# Altium PCB 24V-7A-Power-Board-v2.0.PcbDoc (part 5 of 5)
Units mil, origin at the board's own origin, x right, y up, seen from the top; angles counter-clockwise.
Board outline 4921.26 x 6102.36 mil, 2 copper layers (Top Layer, Bottom Layer); 158 components, 79 nets, 394 pads, 81 vias.
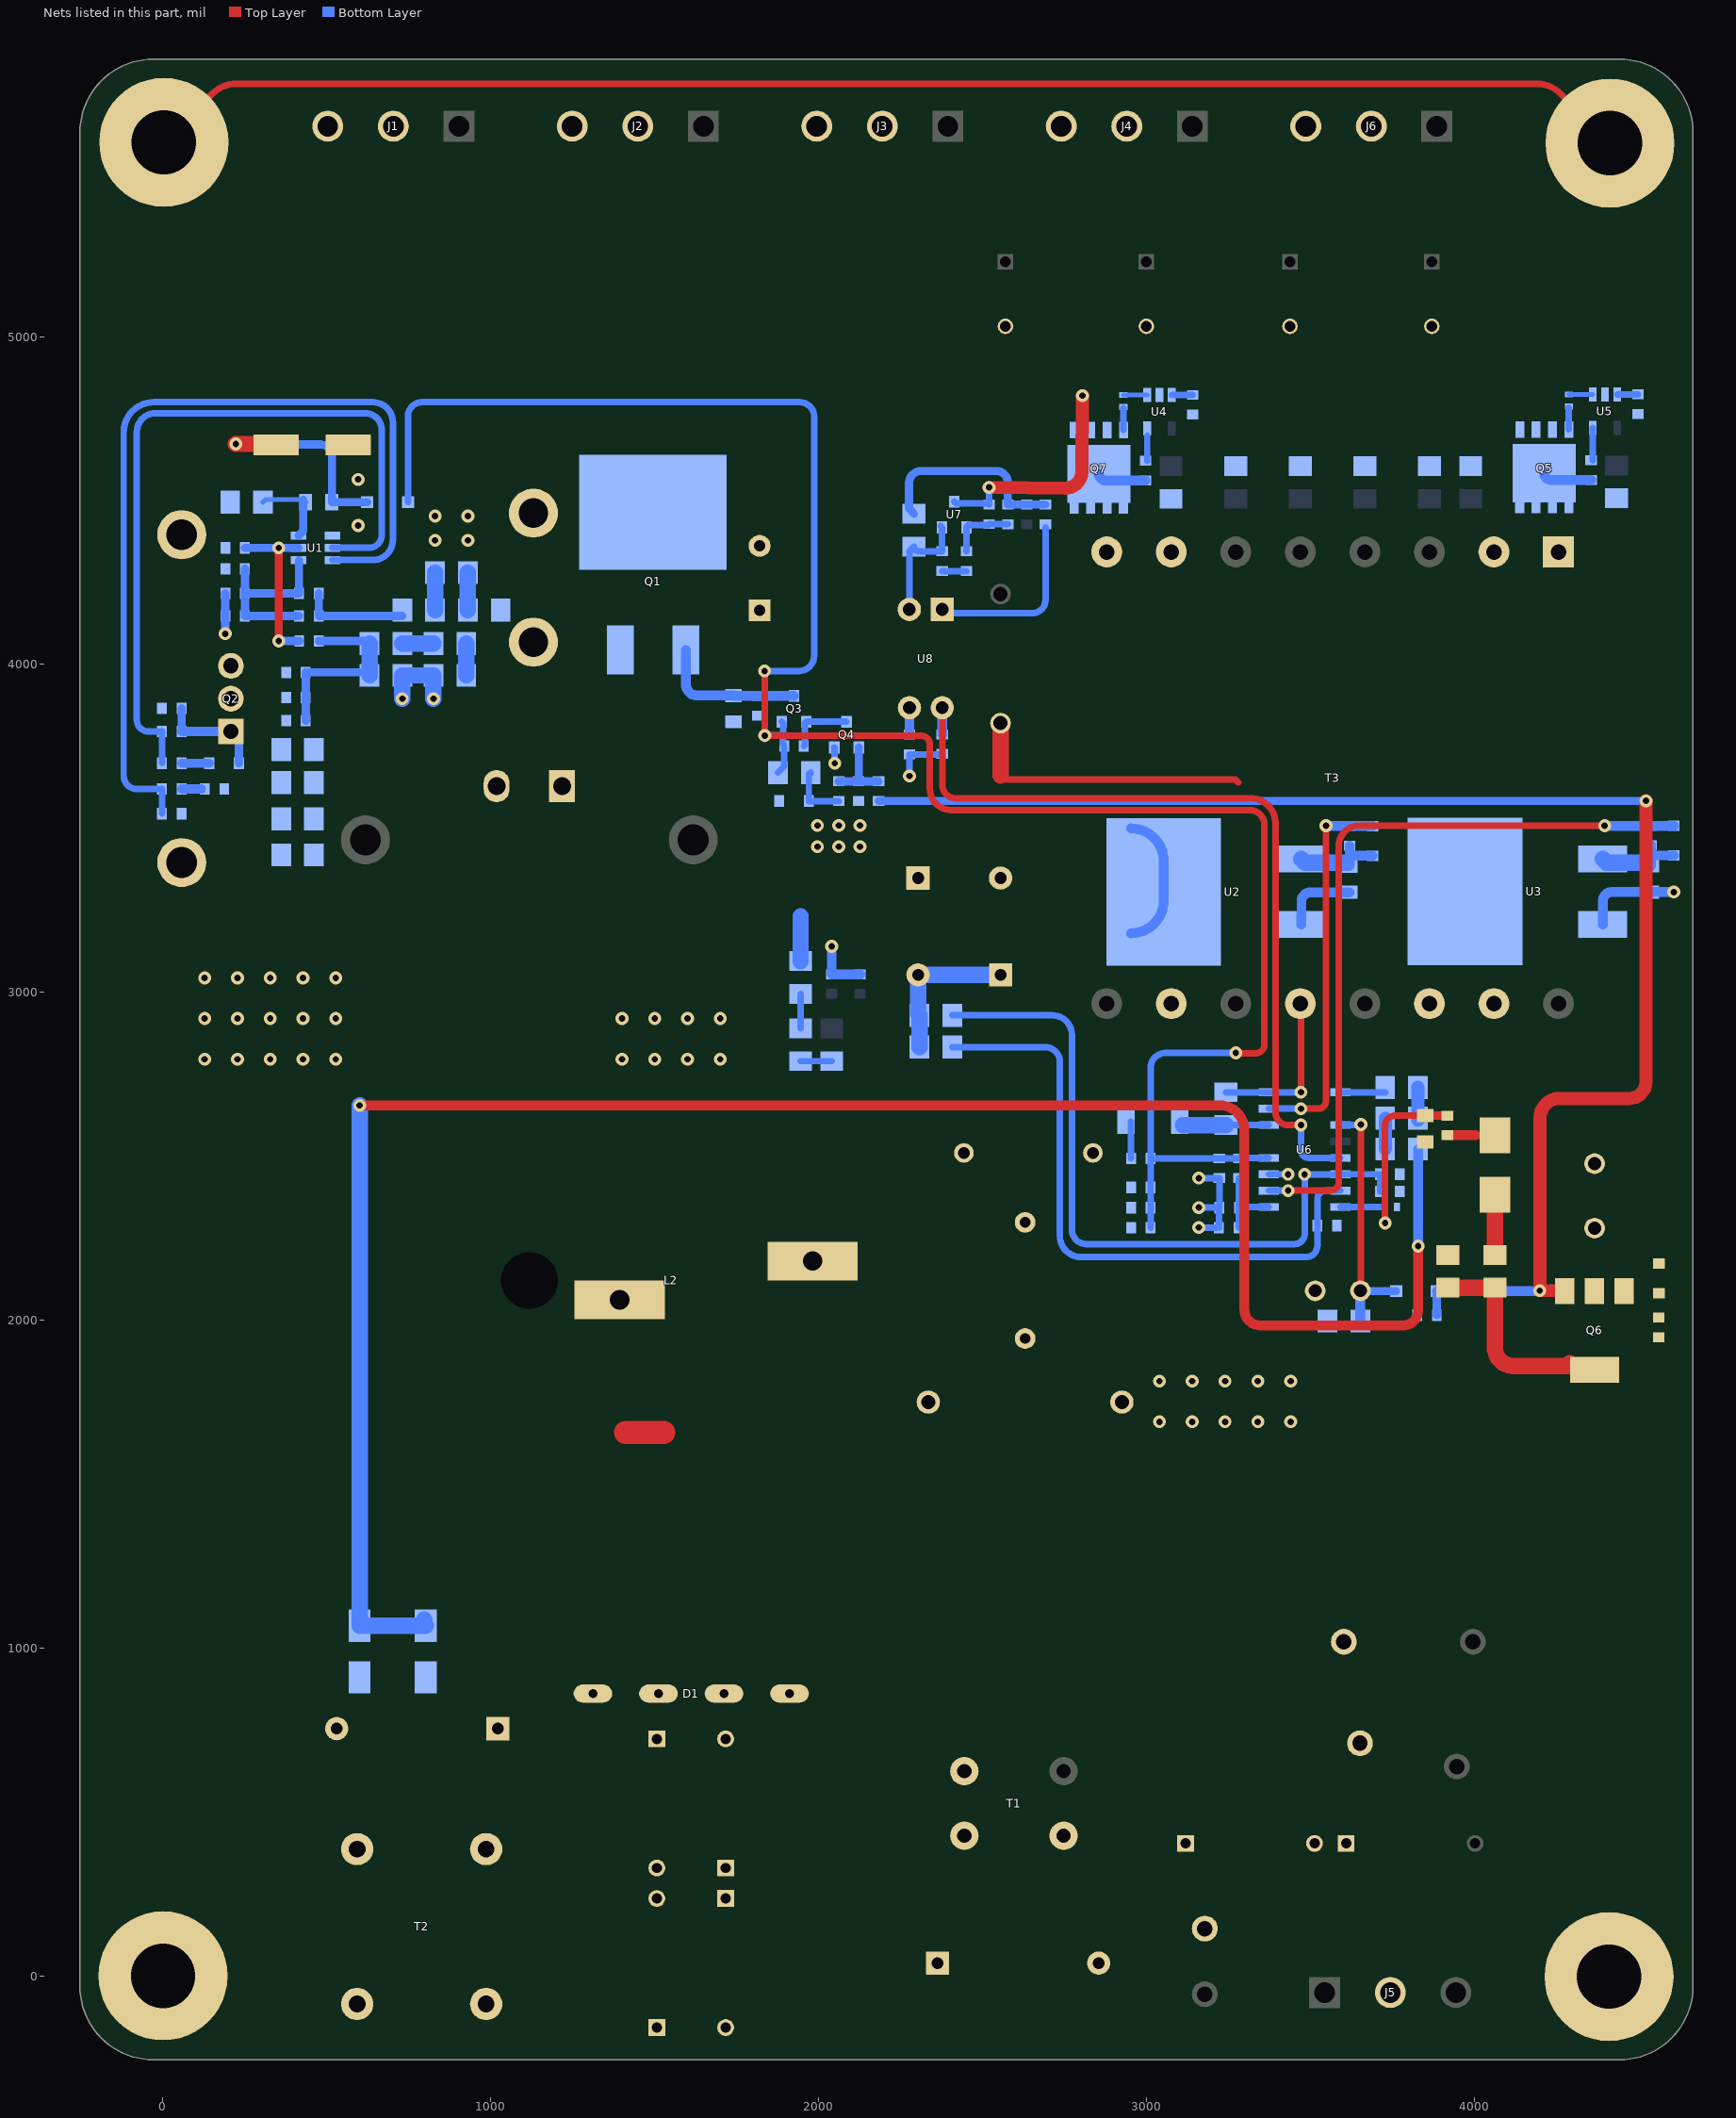
[diagram p2: the nets of this part, all layers, seen from the top]

## Via types
v1: diameter 39.37, hole 19.68, Top Layer to Bottom Layer, tented both sides, 81 vias

## Nets (pads, with @x,y where several pads share a name; then routed paths per layer and width w, separated by ;. In a path a pad name is that pad's centre, name@x,y a point inside that pad or via, vN(x,y) a via of type N, cw(c..) or ccw(c..) an arc to the next point about the centre after c; other vN are vias at no path point) (continued)
BW: C54.2 R30.1 R34.2 U6.8 | length 687.1
  Top Layer w20: v1@3727.6,2293.89 3727.6,2591.3 cw(c3760.19,2591.3) 3760.19,2623.88 R34.2@3850.79,2623.88
  Top Layer w25: R34.2@3850.93,2623.88 R30.1@3918.28,2623.88
  Bottom Layer w15: v1@3727.6,2297.01 C54.2@3727.6,2345.19
  Bottom Layer w20: U6.8@3591.85,2345 C54.2@3724.25,2345
  other v1: 3728.36,2296.25
DRV: R5.1 R8.1 U1.5 | length 2374.8
  Bottom Layer w20: R8.1@-2.99,3698.7 R5.1@-2.99,3795.7 -44.96,3795.7 cw(c-44.96,3830.74) -80,3830.74 -80,4709.1 cw(c-22.86,4709.1) -22.86,4766.24 617.14,4766.24 cw(c617.14,4716.62) 666.51,4721.6 cw(c646.61,4719.64) 666.61,4719.64 666.61,4390.4 cw(c628.51,4393.96) 628.51,4355.7 U1.5@516.57,4355.7
EARTH: C1.1 C2.1 C3.1 C9.2 C10.2 C11.2 J1.3 J2.3 J3.3 J4.3 J5.2 J6.3 pad.MH1 | length 4551.9
  Top Layer w20: pad.MH1@2.54,5592.68 151.74,5741.87 cw(c222.45,5671.16) 222.45,5771.16 4191.67,5771.16 cw(c4191.67,5671.16) 4262.38,5741.87 pad.MH1@4414.12,5590.13
FB: C58.1 U6.5 U8.4 | length 2590.5
  Top Layer w20: U8.4@2377.29,3867.88 2377.29,3632.81 ccw(c2418.35,3632.81) 2418.35,3591.75 3318.17,3591.75 cw(c3318.17,3516.19) 3393.72,3516.19 3393.72,2633.76 ccw(c3432.49,2633.76) 3432.49,2595 v1(3471.39,2595)
  Bottom Layer w20: v1(3471.39,2595) 3471.39,2518.01 ccw(c3494.41,2518.01) 3494.39,2495 3571.34,2495 U6.5@3591.85,2495
  Bottom Layer w30: C58.1@2377.29,3788.2 U8.4@2377.29,3867.88
GND: C4.1 C5.1 C13.1 C18.1 C20.1 C21.2 C22.1 C23.2 C24.1 C33.2 C36.2 C37.1 C45.1 C46.1 C47.1 C48.1 C49.2 C50.1 C51.2 C52.1 C53.1 C54.1 C55.1 C56.1 C58.2 D1.4 D7.2 D11.2 Q1.3 Q4.2 R2.1 R17.1 R18.1 R20.1 R21.2 R22.2 R23.1 R24.1 R26.1 R33.2 R34.1 R47.1 R48.1 R50.1 R51.1 RT1.1 T3.14 U1.4 U3.3 U6.11 | length 2222.8
  Top Layer w20: 2555,3661.08 2566.72,3649.36 3270.64,3649.36 cw(c3270.64,3640) 3271.38,3649.33 3279.97,3640.74 cw(c3270.64,3640) 3280,3640
  Top Layer w50: 2555,3661.08 C24.1@2555,3821.03
  Top Layer w70: 1411.43,1657 1528,1657
  Bottom Layer w20: Q4.2@2047.6,3746.88 2048.38,3746.09 2048.38,3699.43 v1(2049.17,3698.65) ; v1(2277.29,3660) R51.1@2277.29,3725.76 2376.29,3725.76 ccw(c2376.29,3726.76) C58.2@2377.29,3726.76 ; v1(3160,2282.38) ccw(c3161,2282.38) 3161,2281.38 C55.1@3221.6,2281.38 R48.1@3221.6,2343.19 ; v1(3160,2343.19) R48.1@3221.6,2343.19 ; v1(3160,2433.19) C48.1@3222.6,2433.19 ; C48.1@3219.41,2432.19 3222.6,2429 R48.1@3222.6,2343.19 R48.1@3221.6,2343.19 ; U6.11@3373.34,2445 3432.46,2445 v1(3432.46,2444.73)
  Bottom Layer w25: v1(189.99,4093.7) R17.1@190,4216.7
  Bottom Layer w30: v1(2040,3140) C56.1@2040,3055 R50.1@2126.5,3055 ; U3.3@4392.07,3207.06 4392.38,3278.88 cw(c4412.38,3278.79) 4392.49,3280.9 cw(c4420.12,3277.93) 4420.12,3305.72 v1(4609.18,3305.72)
  other v1: 3040,1690 3140,1690 3240,1690 3340,1690 3440,1690 3040,1814 3140,1814 3240,1814 3340,1814 3440,1814 127,2796 227,2796 327,2796 427,2796 527,2796 1400,2796 1500,2796 1600,2796 1700,2796 127,2920 227,2920 327,2920 427,2920 527,2920 1400,2920 1500,2920 1600,2920 1700,2920 127,3044 227,3044 327,3044 427,3044 527,3044 1996.5,3444.14 2061.37,3444.14 2126.25,3444.14 1996.5,3509.01 2061.37,3509.01 2126.25,3509.01 830,4378.48 930,4378.48 595,4424 830,4452.34 930,4452.34 595,4564.26
H_V: C12.1 C25.1 D4.1 R1.2 R43.2 U2.2 | length 578
  Bottom Layer w30: 1940,3236 cw(c1940,3231) 1945,3231 ; U2.2@2952.81,3180 ccw(c2952.81,3280) 3052.81,3280 U2.2@3052.81,3306.34 3052.81,3400 ccw(c2952.81,3400) U2.2@2952.81,3500
  Bottom Layer w50: R43.2@1945,3095 1945,3231
HB: C44.1 D12.1 U6.14 | length 275.6
  Bottom Layer w20: D12.1@3101.86,2605 D12.1@3111.86,2595 ; C44.1@3242.6,2595 U6.14@3373.34,2595
  Bottom Layer w50: D12.1@3111.86,2595 C44.1@3242.6,2595
HO: D8.1 R27.1 U6.15 | length 1170
  Top Layer w20: v1(3471.39,2645) 3525,2645 ccw(c3525,2667.56) 3547.56,2667.56 3547.56,3507.56 v1(3548.03,3508.03)
  Bottom Layer w20: U6.15@3373.34,2645 v1(3471.39,2645)
  Bottom Layer w30: v1(3548.03,3508.03) 3548.78,3507.28 D8.1@3690,3507.28
HS: C44.2 R28.2 T3.12 U2.3 U3.2 U6.16 | length 733.7
  Top Layer w20: T3.12@3469.66,2965.3 cw(c3469.66,2963.57) 3471.39,2963.57 v1(3471.39,2695)
  Bottom Layer w20: C44.2@3242.6,2695 U6.16@3373.34,2695 v1(3471.39,2695)
  Bottom Layer w30: U2.3@3472.89,3206.34 3473.2,3278.16 cw(c3493.2,3278.07) 3473.31,3280.18 cw(c3500.94,3277.21) 3500.94,3305 R28.2@3620,3305
HV_S: D2.1 D3.1 R39.1 | length 6159.7
  Top Layer w30: v1(600,2655) 3223.75,2655 cw(c3223.75,2579.75) 3299,2579.75 3299,2032 ccw(c3347,2032) 3347,1984 3783.94,1984 ccw(c3783.94,2029.06) 3829,2029.06 v1(3829,2226) v1@3829,2227.88
  Bottom Layer w30: R39.1@3828.6,2521.81 3828.6,2226 v1(3829,2226)
  Bottom Layer w50: v1(600,2655) 599.74,2654.74 D3.1@599.74,1067.48 D2.1@801.86,1067.48 ; D2.1@796.51,1086.97 D2.1@798,1085.48
ISNS: C34.1 C52.2 R47.2 U6.6 | length 2210.7
  Bottom Layer w20: C34.1@2407.9,2929.57 2713.4,2929.57 cw(c2713.4,2870) 2772.97,2870 2772.97,2275.26 ccw(c2816.23,2275.26) 2816.23,2231.99 3451.99,2231.99 ccw(c3451.99,2262.73) 3482.73,2262.73 3482.73,2444.87 3591.71,2444.87 U6.6@3591.85,2445 R47.2@3712.6,2445 C52.2@3712.6,2392.19
  other v1: 3482.6,2444.73
LO: D10.1 R32.1 U6.10 | length 2311.5
  Top Layer w20: v1@3432.49,2395 3561.34,2395 ccw(c3561.34,2420.52) 3586.85,2420.52 3586.85,3446.56 cw(c3648.3,3446.56) 3648.3,3508 v1(4398,3508)
  Bottom Layer w20: U6.10@3373.34,2395 v1(3432.47,2395.02)
  Bottom Layer w30: v1(4398,3508) 4402.33,3508 4469.5,3508 R32.1@4539.18,3508 D10.1@4609.18,3508
NetC2_2: C2.2 C7.2 T1.4 T2.1
NetC3_2: C3.2 C8.2 D1.2 D3.2 T2.4
NetC4_2: C4.2 D1.1 L1.1
NetC5_2: C5.2 L1.2 L2.1
NetC6_1: C6.1 C11.1 F1.2 T1.2 VR1.1
NetC7_1: C7.1 C9.1 T1.3 T2.2
NetC8_1: C8.1 C10.1 D1.3 D2.2 T2.3
NetC12_2: C12.2 Q1.2 RT1.2
NetC13_2: C13.2 Q1.1 Q3.3 R2.2 | length 453.9
  Bottom Layer w30: Q1.1@1595,4043.92 1595,3940 ccw(c1630.01,3940) 1630.01,3904.99 R2.2@1740,3904.99 ; R2.2@1740,3904.36 C13.2@1815,3904.36 Q3.3@1925,3904.36
NetC14_1: C14.1 C15.2 C16.2 R10.1 R13.1 R15.2 | length 601.4
  Bottom Layer w15: R10.1@622,4071.7 R10.1@630,4063.7
  Bottom Layer w25: C16.2@435.51,3828.7 C15.2@435.51,3898.7 R15.2@435.51,3975.7 621,3975.7 cw(c621,3966.7) C14.1@630,3966.7 ; R13.1@475.51,4071.7 R10.1@622,4071.7
  Bottom Layer w50: C14.1@630,3966.7 R10.1@630,4063.7
NetC15_1: C15.1 C16.1 Q2.3 R9.2 R15.1 R21.1 R22.1 R23.2 R24.2
NetC17_1: C17.1 D7.1 R19.2 | length 180.2
  Bottom Layer w20: C17.1@1976,3670.25 1970.28,3664.53 D7.1@1970.28,3583.5 1976,3583.5 R19.2@2061.37,3583.5
NetC18_2: C18.2 C19.2 U1.6 | length 2750.3
  Bottom Layer w20: C18.2@-2.99,3545 C19.2@-2.99,3620 -80,3620 cw(c-80,3660) -120,3660 -120,4708.3 cw(c-28.3,4708.3) -28.3,4800 640.17,4800 cw(c640.17,4739.14) 701.03,4739.14 701.03,4379.5 cw(c639.83,4379.5) 639.83,4318.3 U1.6@516.57,4318.3
NetC19_1: C19.1 R20.2 | length 60
  Bottom Layer w28: C19.1@57.01,3620 R20.2@117.01,3620
NetC20_2: C20.2 R14.2 U1.3 | length 251.8
  Bottom Layer w15: C20.2@305,4495 312.64,4502.64 427.36,4502.64 R14.2@435,4495
  Bottom Layer w25: U1.3@413.42,4393.11 413.76,4393.11 425.23,4404.58 425.23,4405.62 427.36,4407.75 R14.2@427.36,4502.64
NetC21_1: C21.1 D6.2 R14.1 | length 686.3
  Top Layer w15: C21.1@342.26,4672.5 cw(c342.26,4670) C21.1@344.76,4670
  Top Layer w50: v1(222.36,4672.5) C21.1@342.26,4672.5
  Bottom Layer w25: v1(222.36,4672.5) ccw(c223.86,4672.5) 223.86,4671 480,4671 cw(c480,4636) 515,4636 R14.1@515,4495 D6.2@622.99,4495
NetC22_2: C22.2 R11.1 R12.1 R17.2 R18.2 U1.1 | length 575.3
  Bottom Layer w25: R17.2@250,4216.7 R18.2@249.99,4291.7 ; R11.1@415,4147.7 C22.2@249.99,4147.7 R17.2@250,4216.7 R12.1@414.99,4216.7 U1.1@414.99,4318.01
NetC25_2: C25.2 C33.1 C34.2 C35.2 T3.10 | length 438.2
  Bottom Layer w50: C35.2@2307.9,2832.69 C34.2@2307.9,2929.57 cw(c2307.9,2934.19) 2303.28,2934.19 C25.2@2303.28,3053.25 2518.28,3053.25
NetC36_1: C36.1 C37.2 Q6.2 Q6.4 R29.1 R31.2 | length 592.8
  Top Layer w50: C37.2@3919.22,2098.88 R29.1@4063.28,2098.88 4063.28,1916.72 ccw(c4120,1916.72) 4120,1860 4283.59,1860 ccw(c4283.59,1868.87) 4292.46,1868.87
NetC40_2: C40.2 U4.3 | length 63.8
  Bottom Layer w20: U4.3@3077.32,4822.09 C40.2@3141.12,4822.09
NetC42_2: C42.2 U5.3 | length 63.8
  Bottom Layer w20: U5.3@4436.36,4823.84 C42.2@4500.16,4823.84
NetC49_1: C49.1 C51.1 D13.2 U6.3 | length 776.9
  Top Layer w20: C49.1@3654.15,2088.88 v1(3654.15,2596.42)
  Bottom Layer w5: C49.1@3652.96,2094.5 ccw(c3658.57,2094.5) C49.1@3658.57,2088.88 ; D13.2@3760.69,2090.02 ccw(c3761.83,2090.02) D13.2@3761.83,2088.88
  Bottom Layer w20: U6.3@3591.85,2595 3652.73,2595 ccw(c3652.73,2596.42) v1(3654.15,2596.42)
  Bottom Layer w25: C49.1@3658.57,2088.88 D13.2@3761.83,2088.88
  Bottom Layer w30: C51.1@3652.56,2002.06 C49.1@3652.56,2094.5
NetC55_2: C55.2 R45.1 R48.2 U6.9 | length 234.9
  Bottom Layer w20: C55.2@3282.6,2282.38 R48.2@3282.6,2343.19 R45.1@3282.6,2433.19 ; R48.2@3289.29,2345 U6.9@3373.34,2345
NetC57_1: C57.1 R55.2 U7.2 U8.2 | length 370.7
  Bottom Layer w20: U8.2@2276.89,4167.87 2276.89,4345.53 R55.2@2290.86,4359.5 ccw(c2305.36,4359.5) 2305.36,4345 C57.1@2376.88,4345 U7.2@2376.88,4418.14 ; U7.2@2372.42,4422.25 U7.2@2376.53,4418.14
NetC57_2: C57.2 R52.1 | length 74.1
  Bottom Layer w20: C57.2@2376.88,4285 R52.1@2450.94,4285
NetD5_1: D5.1 R8.2 | length 84
  Bottom Layer w28: R8.2@57.01,3698.7 D5.1@141,3698.7
NetD5_2: D5.2 Q2.1 R5.2 R9.1 | length 334
  Bottom Layer w15: R9.1@57.01,3866.36 cw(c58.51,3866.36) R9.1@58.51,3867.86 ; Q2.1@207.01,3795.7 cw(c207.01,3771.17) Q2.1@231.55,3771.17
  Bottom Layer w25: R5.2@57.01,3795.7 R9.1@57.01,3866.36 ; D5.2@231.55,3698.7 Q2.1@231.55,3771.17
  Bottom Layer w28: R5.2@57.01,3795.7 Q2.1@207.01,3795.7
NetD8_2: D8.2 R27.2 R28.1 U2.1 | length 274.2
  Bottom Layer w30: R28.1@3620,3385 3620,3416.73 ; R27.2@3620,3447.28 3620,3416.73 ; D8.2@3690,3416.73 3620,3416.73
  Bottom Layer w50: U2.1@3472.89,3406.34 3484.28,3394.95 R28.1@3610.05,3394.95
NetD9_1: D9.1 R30.2 T3.15 | length 149.1
  Top Layer w15: 4004.61,2563.88 cw(c4004.61,2560.22) 4008.28,2560.22 4059.73,2560.22 ccw(c4059.73,2563.77) D9.1@4063.28,2563.77
  Top Layer w30: R30.2@3918.28,2563.88 4004.61,2563.88
NetD9_2: D9.2 R29.2 | length 183.8
  Top Layer w50: R29.2@4063.28,2198.88 D9.2@4063.28,2382.66
NetD10_2: D10.2 R32.2 R33.1 U3.1 | length 274.2
  Bottom Layer w30: R33.1@4539.18,3385.72 4539.18,3417.45 ; R32.2@4539.18,3448 4539.18,3417.45 ; D10.2@4609.18,3417.45 4539.18,3417.45
  Bottom Layer w50: U3.1@4392.07,3407.06 4403.45,3395.67 R33.1@4529.22,3395.67
NetD11_1: D11.1 Q6.1 R31.1
NetD12_2: D12.2 R42.2 | length 111.8
  Bottom Layer w20: R42.2@2953.08,2493.19 D12.2@2953.08,2605
NetQ3_1: Q3.1 Q4.3 R16.1 | length 199.8
  Bottom Layer w20: R16.1@1955,3751.52 1957.99,3754.51 1957.99,3821.2 Q3.1@1962.4,3825.62 Q4.3@2085,3825.62
NetQ4_1: Q4.1 R19.1 R25.2 R26.2 | length 224.9
  Bottom Layer w25: R19.1@2061.37,3643.5 R26.2@2122.4,3643.5 ; Q4.1@2122.4,3746.88 R26.2@2122.4,3643.5 ; R25.2@2182.93,3643.5 R26.2@2122.4,3643.5
NetR1_1: R1.1 R3.2 | length 114.3
  Bottom Layer w50: R1.1@930,4165.7 R3.2@930,4280
NetR3_1: R3.1 R6.2 | length 114.3
  Bottom Layer w50: R6.2@830,4165.7 R3.1@830,4280
NetR4_1: R4.1 R7.2 | length 97
  Bottom Layer w50: R4.1@925.03,3966.7 R7.2@925.03,4063.7
NetR6_1: R6.1 R11.2 R12.2 | length 324
  Bottom Layer w25: R12.2@474.99,4216.7 R11.2@475,4147.7 R6.1@730,4147.7
NetR7_1: R7.1 R10.2 | length 95
  Bottom Layer w50: R10.2@730,4063.7 R7.1@825.03,4063.7
NetR35_2: R35.2 U4.5 | length 76.1
  Bottom Layer w20: R35.2@3002.52,4621.09 3002.52,4697.23
NetR36_2: R36.2 U5.5 | length 98.6
  Bottom Layer w20: R36.2@4361.56,4622.84 U5.5@4361.56,4721.48
NetR37_2: R37.2 U4.1 | length 72.5
  Bottom Layer w15: R37.2@2930,4822.09 U4.1@3002.52,4822.09
NetR38_2: R38.2 U5.1 | length 72.5
  Bottom Layer w15: R38.2@4289.04,4823.84 U5.1@4361.56,4823.84
NetR39_2: R39.2 R40.1 | length 94.1
  Bottom Layer w40: R39.2@3728.6,2521.81 R40.1@3728.6,2615.91
NetR40_2: R40.2 R41.1 | length 100
  Bottom Layer w40: R40.2@3828.6,2610 R41.1@3828.6,2710
NetR41_2: R41.2 U6.1 | length 136.7
  Bottom Layer w20: U6.1@3591.85,2695 R41.2@3728.6,2695
NetR43_1: R43.1 R44.2 | length 105
  Bottom Layer w20: R44.2@1945,2890 R43.1@1945,2995
NetR44_1: R44.1 R46.2 | length 95
  Bottom Layer w20: R44.1@1945,2790 R46.2@2040,2790
NetR49_1: R49.1 R52.2 R53.1 U7.1 | length 204.2
  Bottom Layer w20: R52.2@2450.94,4345 2450.94,4418.14 U7.1@2451.34,4418.14 2451.34,4418.98 2457.48,4425.12 2516.98,4425.12 R49.1@2520,4428.14 R53.1@2577.36,4428.14
NetR51_2: R51.2 U8.3 | length 79.7
  Bottom Layer w30: R51.2@2277.29,3788.2 U8.3@2277.29,3867.88
NetR53_2: R53.2 R54.1 R55.1 R56.2 | length 623.5
  Bottom Layer w25: R55.1@2290.86,4459.5 2276.04,4477 2276.04,4553.59 cw(c2312.45,4553.59) 2312.45,4590 2542.36,4590 cw(c2542.36,4555) 2577.36,4555 R53.2@2577.36,4487.8 R54.1@2634.72,4487.8 R56.2@2692.08,4487.8
NetR56_1: R56.1 U8.1 | length 561.9
  Bottom Layer w20: U8.1@2376.88,4167.88 2402.31,4156.46 2652.22,4156.46 ccw(c2652.22,4196.32) 2692.08,4196.32 R56.1@2692.08,4417.8
RVCC: C17.2 C45.2 C46.2 C47.2 C48.2 D6.1 Q3.2 R16.2 R42.1 R45.2 U6.12 | length 6544.8
  Top Layer w20: v1(1835,3980) 1835.53,3979.47 v1@1835.53,3773.67 ; v1(1836.06,3783.14) 2312.24,3783.14 cw(c2312.24,3756.09) 2339.29,3756.09 2339.29,3620.88 ccw(c2404.17,3620.88) 2404.17,3556 3314.64,3556 cw(c3314.64,3510.64) 3360,3510.64 3360,2840 cw(c3334,2840) 3334,2814 3273.81,2814 cw(c3273.81,2815) v1(3272.81,2815)
  Bottom Layer w20: D6.1@747.01,4495 747.01,4757.49 cw(c789.52,4757.49) 789.52,4800 1942.39,4800 cw(c1942.39,4755.8) 1986.59,4755.8 1986.59,4026.52 cw(c1940.07,4026.52) 1940.07,3980 v1(1835,3980) ; v1@1836.06,3773.14 v1@1837.35,3774.44 ; v1@1837.35,3784.44 1890,3784.44 ; C17.2@1876,3670.25 1895,3689.25 R16.2@1895,3751.52 1890,3756.52 1890,3774.44 ; Q3.2@1887.6,3825.62 1891.78,3821.43 R16.2@1891.78,3761.52 ; C47.2@3013.08,2281.38 C46.2@3013.08,2343.19 C45.2@3013.08,2405 R42.1@3013.08,2493.19 ; C48.2@3219.41,2493.19 R42.1@3013.08,2493.19 ; C48.2@3220.41,2493.19 C48.2@3222.6,2493.19 R45.2@3282.6,2493.19 3284.41,2495 U6.12@3373.34,2495 ; v1(3272.81,2815) 3058,2815 ccw(c3058,2770.08) 3013.08,2770.08 R42.1@3013.08,2493.19
SGND: C26.2 C27.2 C28.2 C29.2 C30.2 C31.2 C32.1 C38.1 C39.1 C40.1 C41.1 C42.1 C43.1 J1.2 J2.2 J3.2 J4.2 J6.2 Q5.1 Q5.2 Q5.3 Q7.1 Q7.2 Q7.3 R49.2 U4.2 U5.2 U7.3 | length 704.4
  Top Layer w40: v1(2520,4540) 2753.39,4537.92 ccw(c2754.01,4586.82) 2802.92,4586.63 2802.92,4586.9 v1(2805,4820)
  Bottom Layer w20: U7.3@2413.93,4496.88 2419.93,4490.88 R49.2@2520,4490.88 ; R49.2@2520,4488.14 R49.2@2520,4490.88 ; v1(2520,4540) R49.2@2520,4490.88
VCC: C50.2 D13.1 Q6.3 R25.1 | length 4577.9
  Top Layer w40: Q6.3@4276.71,2088.88 ccw(c4275.6,2088.88) 4275.6,2090 4201,2090 v1(4200,2090) ccw(c4200,2091) 4201,2091 4201,2616.95 cw(c4260.05,2616.95) 4260.05,2676 4473,2676 ccw(c4473,2727) 4524,2727 v1(4524,3584)
  Bottom Layer w25: R25.1@2182.93,3583.5 4524,3583.5 v1(4524,3584) ; C50.2@3885.84,2015 D13.1@3885.84,2088.88 ; v1@4198.89,2088.89 ccw(c4198.89,2090) v1(4200,2090)
  Bottom Layer w30: D13.1@3885.84,2088.88 v1@4198.89,2088.88
VCR: C35.1 C53.2 U6.7 | length 1954.1
  Bottom Layer w20: C35.1@2407.9,2832.69 2691.01,2832.69 cw(c2691.01,2787.79) 2735.91,2787.79 2735.91,2257.27 ccw(c2801.04,2257.27) 2801.04,2192.14 3486.51,2192.14 ccw(c3486.51,2227.25) 3521.62,2227.25 3521.62,2288.08 3521.62,2369.5 cw(c3547.12,2369.5) 3547.12,2395 U6.7@3591.85,2395
VD: C14.2 D4.2 J8.1 J8.2 L2.2 Q2.2 R4.2 | length 217
  Bottom Layer w50: v1(730,3895.7) C14.2@730,3956.7 ; C14.2@730,3966.7 R4.2@825.03,3966.7 ; v1(825.03,3895.7) R4.2@825.03,3956.7
VD_R1: Q7.5 Q7.6 Q7.7 Q7.8 R35.1 T3.7 T3.8 | length 154.3
  Bottom Layer w30: Q7.8@2854.92,4581.54 ccw(c2875.37,4581.54) 2875.37,4561.09 R35.1@2997.52,4561.09
VD_R2: Q5.5 Q5.6 Q5.7 Q5.8 R36.1 T3.1 T3.2 | length 154.3
  Bottom Layer w30: Q5.8@4213.96,4583.29 ccw(c4234.41,4583.29) 4234.41,4562.84 R36.1@4356.56,4562.84
VG_R1: Q7.4 R37.1 | length 66.3
  Bottom Layer w20: Q7.4@2930,4715 R37.1@2930,4781.32
VG_R2: Q5.4 R38.1 | length 66.3
  Bottom Layer w20: Q5.4@4289.04,4716.75 R38.1@4289.04,4783.07
ZCD/CS: C23.1 R13.2 U1.2 | length 510.2
  Top Layer w25: v1(353.19,4071.7) v1(353.19,4355.79)
  Bottom Layer w25: C23.1@250.17,4355.88 353.1,4355.88 v1(353.19,4355.79) ; v1(353.19,4071.7) R13.2@415.51,4071.7 R13.2@416.02,4071.7 ; v1@353.19,4355.7 U1.2@413.42,4355.7
pads on no net: J7.1 J7.2 L2.M1 T3.9 T3.11 T3.13 T3.16

## Polygon pours and split planes (outlines as drawn)
24VDC on Top Layer "NONET_L-01_P-001" (solid, pour order 16): 3143.42,5030 ccw(c3043.42,5030) 3043.42,5130 870,5130 cw(c870,5203.7) 796.3,5203.7 796.3,5675.42 cw(c824.5,5675.42) 824.5,5703.62 975.93,5703.62 cw(c975.93,5673.26) 1006.3,5673.26 1006.3,5557.14 ccw(c1033.7,5557.14) 1033.7,5529.74 1511.96,5529.74 ccw(c1511.96,5560) 1542.22,5560 1542.22,5677.54 cw(c1568.3,5677.54) 1568.3,5703.62 1721.86,5703.62 cw(c1721.86,5673.26) 1752.22,5673.26 1752.22,5560 ccw(c1782.48,5560) 1782.48,5529.74 2257.89,5529.74 ccw(c2257.89,5560) 2288.15,5560 2288.15,5677.54 cw(c2314.23,5677.54) 2314.23,5703.62 2467.78,5703.62 cw(c2467.78,5673.26) 2498.15,5673.26 2498.15,5567.2 ccw(c2535.6,5567.2) 2535.6,5529.74 2998.81,5529.74 ccw(c2998.81,5565) 3034.07,5565 3034.07,5677.54 cw(c3060.15,5677.54) 3060.15,5703.62 3213.71,5703.62 cw(c3213.71,5673.26) 3244.07,5673.26 3244.07,5560 ccw(c3274.33,5560) 3274.33,5529.74 3752.12,5529.74 ccw(c3752.12,5557.62) 3780,5557.62 3780,5677.54 cw(c3806.08,5677.55) 3806.07,5703.63 3960.64,5703.63 cw(c3960.51,5674.15) 3990,5674.02 3990,4183.25 3143.42,4183.25
GND on Top Layer "NONET_L-01_P-001" (solid, remove dead copper, pour order 13): 1152.37,1620 cw(c1152.37,1520) 1252.37,1520 1252.37,860.96 ccw(c1279.93,860.96) 1279.93,833.4 1342.92,833.4 ccw(c1342.92,860.96) 1370.48,860.96 1370.48,1520 cw(c1470.48,1520) 1470.48,1620 4647.3,1620 4647.3,3670 3478.16,3670 3049.08,3670 2670,3670 cw(c2670,3720) 2620,3720 2620,3867.88 2404.17,3867.88 2404.17,3620.88 2309.03,3620.88 2309.03,3751.98 1903.74,3751.98 1903.74,3670 560,3670 560,3965.33 1903.74,3965.33 1903.74,4745 433.66,4745 433.66,3967.86 -253.57,3967.86 -253.57,1620
NetC7_1 on Top Layer "NONET_L-01_P-001" (solid, pour order 0): 809.47,77.08 cw(c885,77.08) 885,152.6 1872.6,152.6 ccw(c1872.6,209.13) 1929.13,209.13 1929.13,409.1 cw(c1992.4,409.17) 1992.41,472.44 2550.2,472.44 cw(c2550.2,401.69) 2620.95,401.69 2620.95,-174.96 cw(c2565.22,-174.97) 2565.22,-230.69 1851.54,-230.69 cw(c1851.54,-193.84) 1814.69,-193.84 1814.69,-93.52 ccw(c1780.88,-93.52) 1780.88,-59.7 1651.09,-59.7 ccw(c1651.09,-92.63) 1618.17,-92.63 1618.17,-192.53 cw(c1580,-192.53) 1580,-230.69 860.61,-230.69 cw(c860.61,-179.55) 809.47,-179.55
no net on Top Overlay "NONET_L02_P040" (hatched 45Degree grid 35 track 6): 2338.62,1555 ccw(c2338.62,1366.38) 2150,1366.38 2150,805 2310,805 2310,1295 cw(c2389.3,1294.3) 2390,1373.61 4650,1373.61 4650,1555
no net on Top Overlay "NONET_L02_P040" (hatched 45Degree grid 35 track 6): 2183.01,4240 2183.01,4174.61 ccw(c2250,4174.61) 2250,4107.62 4630,4107.62 4630,3926.23 2133.77,3926.22 cw(c2133.77,4036.99) 2023.01,4036.99 2023.01,4768.11 ccw(c1941.12,4768.11) 1941.12,4850 -212,4850 -212,5025 1995,5025 cw(c1995,4837) 2183.01,4836.99 2183.01,4566.31
H_V on Bottom Layer "NONET_L-01_P-001" (solid, pour order 19): 3227.81,3550.72 2352.14,3550.72 ccw(c2352.14,3450.72) 2281.43,3521.43 2159.48,3399.48 cw(c2088.77,3470.19) 2088.77,3370.19 1349.81,3370.19 cw(c1349.81,3420) 1300,3420 1300,4180 ccw(c1240,4180) 1240,4240 1046.44,4240 ccw(c1046.44,4193.56) 1000,4193.56 1000,3800 ccw(c1040,3800) 1040,3760 1100,3760 cw(c1100,3720) 1140,3720 1140,3238.81 ccw(c1198.81,3238.81) 1198.81,3180 2618.58,3180 cw(c2618.58,3080.01) 2689.29,3150.71 2729.37,3110.63 ccw(c2800.08,3181.34) 2800.08,3081.34 3227.81,3081.34
SGND on Bottom Layer "NONET_L-01_P-001" (solid, pour order 17): 2084.17,5130.84 cw(c2084.17,4959.14) 2255.86,4959.14 2255.86,4709.14 ccw(c2342.15,4709.14) 2342.15,4622.85 2557.35,4622.85 cw(c2557.36,4568.83) 2611.38,4568.83 2611.38,4532.49 2758.46,4532.49 2758.46,4184.99 ccw(c2760.2,4184.99) 2760.2,4183.25 4650,4183.25 4650,4990.35 4650,5725.86 ccw(c4550,5725.86) 4550,5825.86 2537.5,5825.6 435.41,5825.6 ccw(c435.4,5735.2) 345,5735.19 345,5230.84 ccw(c445,5230.84) 445,5130.84
VD_R2 on Bottom Layer "NONET_L-01_P-001" (solid, pour order 18): 4067.08,4428.65 4023.65,4428.65 ccw(c4023.65,4375) 3970,4375 3970,4226.22 ccw(c4012.03,4227.15) 4012.96,4185.12 4265.25,4185.12 ccw(c4265.25,4230.29) 4310.42,4230.29 4310.42,4671.99 4117.51,4671.99 4117.51,4479.08 cw(c4067.08,4479.08)
GND on Bottom Layer "NONET_L-01_P-001" (solid, remove dead copper, pour order 12): 4667.69,3342.2 4245,3342.2 4245,3595.92 2070.41,3595.92 cw(c2070.41,3695.92) 1970.41,3695.92 1970.41,4728.87 ccw(c1870.41,4728.87) 1870.41,4828.87 -253.57,4828.87 -253.57,1570 1086.43,1570 cw(c1086.43,1470) 1186.43,1470 1186.43,868.28 ccw(c1242.95,868.28) 1242.95,811.75 1356.72,811.75 ccw(c1356.72,865.04) 1410,865.04 1410,1470 cw(c1510,1470) 1510,1570 4667.69,1570
NetC2_2 on Bottom Layer "NONET_L-01_P-001" (solid, pour order 2): 2940,426.49 ccw(c2892.53,426.49) 2892.53,473.96 2630.44,473.96 ccw(c2630.44,422.57) 2579.06,422.57 2579.06,24.34 cw(c2519.85,24.18) 2520,-35.03 2190,-35.03 2050,-35.03 cw(c2050,19.97) 1995,19.97 1995,114.97 ccw(c1940,114.97) 1940,169.97 495.7,169.97 ccw(c495.7,114.26) 440,114.26 440,-185.03 ccw(c490.69,-185.03) 490.69,-235.72 1374.31,-235.72 ccw(c1374.31,-201.87) 1408.17,-201.86 1408.17,-100.82 cw(c1444.25,-100.81) 1444.25,-64.74 1568.61,-64.74 cw(c1568.61,-100.81) 1604.69,-100.82 1604.69,-199.72 ccw(c1640.69,-199.73) 1640.69,-235.72 2149.98,-235.72 2885.16,-235.72 ccw(c2885.16,-180.89) 2940,-180.89
VD_R1 on Bottom Layer "NONET_L-01_P-001" (solid, pour order 1): 3114.37,4426.78 cw(c3114.37,4368.14) 3173.02,4368.06 3172.84,4226.81 cw(c3133,4223.25) 3133,4183.25 2803.64,4183.25 cw(c2803.64,4228.43) 2758.46,4228.43 2758.46,4670.12 2951.38,4670.12 2951.38,4477.21 ccw(c3001.81,4477.21) 3001.81,4426.78
AC_N on Bottom Layer "NONET_L-01_P-001" (solid, pour order 3): 2579.06,1200 cw(c2679.06,1200) 2679.06,1300 4346.85,1300 cw(c4346.85,1200) 4446.85,1200 4446.85,784.57 4446.85,410 cw(c4366.85,410) 4366.85,330 3943.11,330 cw(c3943.11,395) 3878.11,395 3878.11,482.62 ccw(c3809.55,482.63) 3809.55,551.18 2647.21,551.18 cw(c2647.21,619.33) 2579.06,619.33
no net on Bottom Overlay "NONET_L02_P040" (hatched 45Degree grid 35 track 6): 1923.01,4875 cw(c1923.01,4775) 2023.01,4775 2023.01,4036.99 ccw(c2133.77,4036.99) 2133.77,3926.22 4630,3926.23 4630,4107.62 2250,4107.62 cw(c2250,4174.61) 2183.01,4174.61 2183.01,4240 2183.01,4566.31 2183.01,4813.15 2183.01,4872 ccw(c1995,4872) 1995,5060 1630,5060 -95,5060 -95,4875
no net on Bottom Overlay "NONET_L02_P040" (hatched 45Degree grid 35 track 6): -253.57,1338.61 -253.57,1520 1115.46,1520 1115.46,1338.61
no net on Bottom Overlay "NONET_L02_P040" (hatched 45Degree grid 35 track 6): 1500,1338.61 1500,1520 4667.69,1520 4667.69,1338.61

## Other copper
Top Layer:
  rectangle net VCC: 4164.19,2049.51 4306.24,2128.25
  pour cut-out: 1862.97,3153 303.08,3153 303.08,3743 1862.97,3743
  region net NetD9_2: 4148.28,2190.54 cw(c4122.74,2190.54) 4122.74,2165 4006,2165 cw(c4006,2192.72) 3978.28,2192.72 3978.28,2428.03 cw(c4004.4,2428.03) 4004.4,2454.14 4121,2454.14 cw(c4121,2426.86) 4148.28,2426.86
  region net VD: 760,3770 cw(c760,3720) 810,3720 810,3624.82 ccw(c864.82,3624.82) 864.82,3570 961.91,3570 1024.04,3570 ccw(c1024.04,3605.95) 1060,3605.96 1060,3898.31 ccw(c1023.23,3898.31) 1023.23,3935.07 160,3935.07 cw(c160,3963.79) 131.28,3963.79 131.28,4396.24 ccw(c57.02,4396.24) 57.02,4470.51 ccw(c57.01,4395.71) -17.78,4395.7 -17.78,3395.7 ccw(c57.02,3395.7) 57.02,3320.9 ccw(c57.02,3395.7) 131.82,3395.7 131.82,3834.83 cw(c153.33,3834.83) 153.33,3856.33 263.43,3856.33 cw(c263.43,3835.08) 284.69,3835.07 284.69,3795.31 ccw(c310,3795.31) 310,3770
  region net NetC6_1: 2346.85,1200 cw(c2446.85,1200) 2446.85,1300 3650,1300 cw(c3650,1200) 3750,1200 3750,865 3750,640 cw(c3676.94,640) 3676.94,566.94 3454.94,566.94 ccw(c3454.94,488.85) 3376.85,488.85 3376.85,152.89 cw(c3308.95,152.89) 3308.95,85 3066.84,85 cw(c3066.84,159.99) 2991.85,159.99 2991.85,728.15 ccw(c2930,728.15) 2930,790 2680,790 ccw(c2680,731.85) 2621.85,731.85 2621.85,606.54 cw(c2566.49,606.54) 2566.49,551.18 2396.82,551.18 cw(c2396.82,601.15) 2346.85,601.15
  region net EARTH: 250.12,-235.72 ccw(c250.12,-186.9) 298.95,-186.9 298.95,-61.78 298.95,112.16 cw(c380,112.16) 380,193.21 1823.07,193.21 ccw(c1823.07,230.14) 1860,230.14 1860,340 ccw(c1820,340) 1820,380 1206.79,380 ccw(c1206.79,280.01) 1136.08,350.71 1105.27,319.9 cw(c1034.57,390.61) 1034.56,290.61 -189.39,290.61 ccw(c-189.39,246.82) -233.18,246.82 -233.18,-36.82 ccw(c-34.28,-36.82) -34.28,-235.72
  region net EARTH: 153 vertices and 0 holes, not listed, extent -233.18,5340 4647.3,5825.86
  region net GND: 4533.57,2157.41 cw(c4533.57,2180.33) 4510.66,2180.33 4510.66,2370.2 ccw(c4476.85,2370.2) 4476.85,2404 4286.98,2404 cw(c4286.98,2430.38) 4260.6,2430.38 4260.6,2541.75 cw(c4293.85,2541.75) 4293.85,2575 4569.85,2575 cw(c4569.85,2537) 4607.85,2537 4607.85,2176.63 cw(c4588.63,2176.63) 4588.63,2157.41
  region net NetD11_1: 4428.29,2128.25 4568.09,2128.25 cw(c4568.09,2104.06) 4592.28,2104.06 4592.28,2007.06 cw(c4572.98,2007.06) 4572.98,1987.76 4448.33,1987.76 cw(c4448.33,2007.81) 4428.29,2007.81
  region net NetC36_1: 3884.22,2138 3884.22,1811.78 ccw(c3927,1812.78) 3928,1770 4368.35,1770 4571.85,1770 ccw(c4571.85,1795) 4596.85,1795 4596.85,1941.23 ccw(c4569.28,1941.24) 4569.28,1968.81 4422.04,1968.81 cw(c4422.04,1994.06) 4396.79,1994.06 4396.79,2198.88 cw(c4409.53,2198.88) 4409.53,2211.63 4450.56,2211.63 ccw(c4450.56,2237.92) 4476.85,2237.92 4476.85,2276.93 4476.85,2346.85 ccw(c4452.7,2346.85) 4452.7,2371 4284.85,2371 ccw(c4284.85,2346.75) 4260.6,2346.75 4260.6,2238.26 ccw(c4286.98,2238.26) 4286.98,2211.88 4324.74,2211.88 cw(c4324.74,2198.89) 4337.73,2198.88 4337.73,2165.12 4337.73,1992.88 cw(c4313.66,1992.88) 4313.66,1968.81 4288.16,1968.81 4164.19,1968.81 cw(c4164.19,2017) 4116,2017 4116,2113 ccw(c4091,2113) 4091,2138
  region net NetD9_1: 4008.28,3040.4 4113.28,3040.4 cw(c4113.28,3005.4) 4148.28,3005.4 4148.28,2526.57 cw(c4121,2526.57) 4121,2499.29 4004.4,2499.29 cw(c4004.4,2525.4) 3978.28,2525.4 3978.28,3010.4 cw(c4008.28,3010.4)
  region net NetC4_2: 2058.52,790 ccw(c2058.52,841.48) 2110,841.48 2110,1471.92 cw(c2255.68,1474.32) 2253.28,1620 2644.06,1620 ccw(c2644.06,1695.94) 2720,1695.94 2720,1960 ccw(c2650,1960) 2650,2030 1910,2030 ccw(c1910,1961.43) 1841.43,1961.43 1841.43,841.53 ccw(c1892.96,841.53) 1892.96,790
  region net NetC8_1: 1022.09,330 ccw(c1022.09,406.22) 1075.99,352.32 1110.63,386.97 cw(c1181.34,316.26) 1181.34,416.26 1196.94,417.62 1547.62,417.62 ccw(c1547.62,470) 1600,470 1600,920 ccw(c1559.27,920) 1559.27,960.73 1465.39,960.73 ccw(c1465.39,923.03) 1427.69,923.03 1427.69,650.57 cw(c1372.12,650.57) 1372.12,595 1175,595 cw(c1175,645) 1125,645 1125,799.32 ccw(c1074.32,799.32) 1074.32,850 860,850 ccw(c860,800) 810,800 810,379.53 ccw(c859.53,379.53) 859.53,330
  region net AC_N: 3878.11,-181.13 ccw(c3926.98,-181.13) 3926.98,-230 4105.41,-230 ccw(c4105.41,-183.56) 4151.85,-183.56 4151.85,470 4151.85,1123.74 ccw(c4099.23,1123.74) 4099.23,1176.36 3926.85,1176.36 ccw(c3926.85,1127.63) 3878.11,1127.62
  region net AC_L: 3570.78,-230.69 ccw(c3570.78,-184.62) 3616.85,-184.62 3616.85,-29.25 ccw(c3567.6,-29.25) 3567.6,20 3042.66,20 ccw(c3042.66,-27.88) 2994.78,-27.88 2994.78,-188.62 ccw(c3036.85,-188.62) 3036.85,-230.69
  pour cut-out: -253.57,3153 -253.57,4638.5 352,4638.5 352,3153
  region net NetC25_2: 2284.48,3138.17 ccw(c2284.48,3088.69) 2235,3088.69 2235,2769.53 ccw(c2293.53,2769.53) 2293.53,2711 3136.27,2711 3144.65,2712.67 3152.53,2715.93 3159.64,2720.68 3165.67,2726.72 3170.42,2733.82 3173.69,2741.71 3175.35,2750.08 3175.35,3086.94 3173.17,3097.92 3168.88,3108.26 3162.66,3117.57 3154.75,3125.48 3145.44,3131.7 3135.1,3135.99 3124.12,3138.17 hole: 2885.73,3032.55 2872.48,3032.55 2859.49,3029.96 2847.25,3024.89 2836.24,3017.53 2826.87,3008.17 2819.52,2997.15 2814.45,2984.92 2811.86,2971.92 2811.86,2958.68 2814.45,2945.69 2819.52,2933.45 2826.87,2922.44 2836.24,2913.07 2847.25,2905.71 2859.49,2900.64 2872.48,2898.06 2885.73,2898.06 2898.72,2900.64 2910.96,2905.71 2921.97,2913.07 2931.34,2922.44 2938.7,2933.45 2943.77,2945.69 2946.35,2958.68 2946.35,2971.92 2943.77,2984.92 2938.7,2997.15 2931.34,3008.17 2921.97,3017.53 2910.96,3024.89 2898.72,3029.96
Bottom Layer:
  rectangle net SGND: 4387.15,4772.66 4410.77,4890
  rectangle net NetD10_2: 4317.07,3365.72 4638.18,3468.22
  rectangle net NetD8_2: 3397.89,3365 3719,3467.5
  region net NetC12_2: 1010.57,4578.75 cw(c1070.82,4578.75) 1070.82,4639 1795.99,4639 cw(c1798.27,4572.72) 1864.56,4575 1864.56,4340 cw(c1813.56,4340) 1813.56,4289 1077.11,4289 cw(c1077.11,4355.53) 1010.57,4355.53
  region net HS: 3365,2921.72 ccw(c3393.72,2921.72) 3393.72,2893 3545.83,2893 ccw(c3545.38,2917.61) 3570,2918.06 3570,3045 cw(c3607.06,3045) 3607.06,3082.06 4209.82,3082.06 ccw(c4209.82,3117.24) 4245,3117.24 4245,3535.03 3780,3535.03 3780,3365 cw(c3745,3365) 3745,3330 3405,3330 ccw(c3405,3290) 3365,3290
  region net NetC15_1: 198.69,3956.33 34.56,3956.33 ccw(c34.56,3933.78) 12.01,3933.78 12.01,3848.95 -17.99,3848.95 -17.99,4007.01 cw(c10.07,4007.01) 10.07,4035.07 240.76,4035.07 353.64,4035.07 cw(c353.64,3993.2) 395.51,3993.2 395.51,3356.1 cw(c359.71,3355.81) 360,3320 310.18,3320 cw(c310.18,3355.17) 275.01,3355.17 275.01,3918.7 ccw(c237.38,3918.7) 237.38,3956.33
  region net NetC20_2: 273.15,4534 443.71,4534 cw(c443.71,4512.72) 464.99,4512.72 464.99,4394.34 cw(c451.55,4394.34) 451.55,4380.9 391.85,4380.9 cw(c391.85,4392.75) 380,4392.75 380,4440 ccw(c360,4440) 360,4460 275,4460 cw(c275,4470.01) 264.99,4470.01 264.99,4525.84 cw(c273.15,4525.84)
  region net EARTH: 2120,644.33 2120,1329 cw(c2266.56,1329) 2266.56,1475.56 4441.44,1475.56 cw(c4441.45,1291.23) 4625.77,1291.23 4625.77,692.89 4625.77,-34.23 4625.77,-45.95 4622.71,-69.2 4616.64,-91.84 4607.67,-113.5 4595.95,-133.81 4581.68,-152.41 4565.1,-168.99 4546.5,-183.26 4526.19,-194.98 4504.53,-203.95 4481.89,-210.02 4458.64,-213.08 4446.92,-213.08 4207.91,-213.08 4201.22,-213.08 4188.1,-210.47 4175.74,-205.35 4164.62,-197.92 4155.16,-188.46 4147.73,-177.34 4142.61,-164.98 4140,-151.86 4140,-145.17 4140,40 4139.76,44.9 4137.85,54.51 4134.1,63.57 4128.65,71.72 4121.72,78.65 4113.57,84.1 4104.51,87.85 4094.9,89.76 4090,90 3860.26,90 3854.87,89.73 3844.3,87.63 3834.34,83.51 3825.37,77.52 3817.75,69.89 3811.76,60.93 3807.63,50.97 3805.53,40.39 3805.26,35 3805.26,-107.86 3805.27,-110.42 3804.27,-115.43 3802.31,-120.15 3799.47,-124.41 3795.86,-128.02 3791.6,-130.86 3786.88,-132.82 3784.12,-133.37 3779.31,-133.81 3713.81,-133.81 3711.19,-133.81 3706.04,-132.79 3701.19,-130.78 3696.83,-127.87 3693.11,-124.15 3690.2,-119.79 3688.19,-114.94 3687.16,-109.79 3687.16,-107.16 3687.16,274.68 3686.99,278.15 3685.64,284.94 3682.99,291.33 3679.15,297.09 3674.25,301.98 3668.5,305.83 3662.1,308.48 3655.31,309.83 3651.85,310 3486.74,310 3480.33,311.27 3474.3,313.77 3468.87,317.4 3464.25,322.02 3460.62,327.45 3458.12,333.48 3456.85,339.88 3456.85,436.85 cw(c3495.47,436.85) 3495.47,475.47 3749.84,475.47 cw(c3750.19,420.39) 3805.26,420.73 3805.26,268.14 3805.5,263.42 3807.34,254.16 3810.95,245.45 3816.19,237.6 3822.86,230.93 3830.71,225.68 3839.43,222.07 3848.68,220.23 3853.4,220 4490.45,220 4494.72,220.21 4503.09,221.88 4510.98,225.14 4518.08,229.89 4524.11,235.92 4528.86,243.02 4532.12,250.91 4533.79,259.28 4534,263.55 4534,1277.81 ccw(c4434,1277.81) 4434,1377.81 2289.81,1377.81 ccw(c2289.81,1316) 2228,1316 2228,602 2228,390 2228,380.15 2224.16,360.83 2216.62,342.63 2205.68,326.25 2191.75,312.32 2175.37,301.38 2157.17,293.84 2137.85,290 2128,290 1473.29,290 cw(c1473.29,320.91) 1442.39,320.91 1442.39,346.98 cw(c1473.41,346.98) 1473.41,378 1506.43,378 2062.23,378 2067.9,378.28 2079,380.49 2089.46,384.82 2098.88,391.11 2106.89,399.12 2113.18,408.54 2117.51,419 2119.72,430.1 2120,435.77
  region net NetC3_2: 733.98,635 cw(c733.98,688.98) 680,688.98 680,912.41 ccw(c633.2,912.42) 633.2,959.22 489.22,959.22 ccw(c489.21,910) 440,910 440,309.78 ccw(c488.61,309.77) 488.61,261.16 701.16,261.16 ccw(c701.17,314.99) 755,315 755,423.31 cw(c798.06,423.31) 798.06,466.37 1756.37,466.37 ccw(c1756.37,521.43) 1811.43,521.43 1811.43,908.57 ccw(c1769.27,908.57) 1769.26,950.74 1681.18,950.73 ccw(c1681.18,907.25) 1637.69,907.24 1637.69,675 cw(c1597.58,675.1) 1597.47,635
  region net EARTH: 97.89,5825.86 153.86,5825.86 cw(c153.86,5742.11) 237.61,5742.11 237.61,5237.61 cw(c140,5237.61) 140,5140 -72.16,5140 ccw(c-74.31,5054.31) -160,5056.46 -160,339.26 ccw(c-111.36,339.26) -111.36,290.61 240,290.61 cw(c239.7,231.36) 298.95,231.05 298.95,-191.05 cw(c254.28,-191.05) 254.28,-235.72 -5.63,-235.72 cw(c-5.63,-8.18) -233.18,-8.18 -233.18,5621.04 cw(c-28.36,5621.04) -28.36,5825.86
  region net VD: 952.54,2372.2 cw(c952.54,2452.7) 872.05,2452.7 872.05,3653.52 cw(c926.26,3653.52) 926.26,3707.74 1043.33,3707.74 cw(c1043.33,3650.15) 1100.92,3650.15 1100.92,2767.48 ccw(c1200.92,2767.48) 1200.92,2667.48 1574.8,2667.48 cw(c1574.8,2569.06) 1673.23,2569.06 1673.23,1952.25 cw(c1601.06,1952.25) 1601.05,1880.08 1337.52,1880.08 cw(c1337.51,1962.28) 1255.32,1962.28 1255.32,2297.99 ccw(c1181.1,2297.99) 1181.1,2372.2
  region net NetC5_2: 1868.85,2652 ccw(c1868.85,2587.15) 1804,2587.15 1804,2112.09 ccw(c1886.08,2112.09) 1886.08,2030 2584,2030 ccw(c2584,2110) 2664,2110 2664,2583.94 ccw(c2595.94,2583.94) 2595.94,2652
  pour cut-out: 3700.64,1018.88 cw(c3602.37,1018.88) 3602.37,920.62 cw(c3602.37,1018.88) 3504.11,1018.88 cw(c3602.37,1018.88) 3602.37,1117.15 cw(c3602.37,1018.88)
  pour cut-out: 3749.89,709.27 cw(c3651.62,709.27) 3651.62,611.01 cw(c3651.62,709.27) 3553.36,709.27 cw(c3651.62,709.27) 3651.62,807.53 cw(c3651.62,709.27)
  region net NetC8_1: 1056.56,960 cw(c1056.56,916.56) 1100,916.56 1100,729.97 cw(c1055.02,729.97) 1055.02,684.99 881.64,685 779.64,685 cw(c779.64,726.23) 738.41,726.23 738.41,917.57 cw(c780.84,917.57) 780.84,960
  pour cut-out: 1084.06,-86.12 cw(c985.8,-86.12) 985.8,-184.38 cw(c985.8,-86.12) 887.54,-86.12 cw(c985.8,-86.12) 985.8,12.15 cw(c985.8,-86.12)

## Silkscreen, mask and mechanical layers (free items; w line width, h text height)
Top Overlay:
  drawing of 12 lines, arcs and shapes, not listed
  text "E" at 577.28,5429.2 h78.74 r180
  text "GND" at 780.44,5429.2 h78.74 r180
  text "24V" at 980.55,5429.19 h78.74 r180
  text "E" at 1323.21,5429.2 h78.74 r180
  text "GND" at 1526.36,5429.2 h78.74 r180
  text "24V" at 1726.48,5429.19 h78.74 r180
  text "E" at 2069.13,5429.2 h78.74 r180
  text "GND" at 2272.29,5429.2 h78.74 r180
  text "24V" at 2472.4,5429.19 h78.74 r180
  text "E" at 2815.06,5429.2 h78.74 r180
  text "GND" at 3018.21,5429.2 h78.74 r180
  text "24V" at 3218.33,5429.19 h78.74 r180
  text "E" at 3560.98,5429.2 h78.74 r180
  text "GND" at 3764.14,5429.2 h78.74 r180
  text "24V" at 3964.25,5429.19 h78.74 r180
  text "HIGH VOLTAGE" at -220.19,5065.72 h120
  text "Canagey 1.0" at -42.83,1667.37 h200 r90
  text "CAUTION" at 2791.77,940.72 h120
  text "HIGH VOLTAGE" at 2688.67,848.93 h120
  text "AC-L" at 3457.77,174.72 h100
  text "AC-N" at 3844.77,174.72 h100
  text "E" at 3685.1,163.88 h78.74
Bottom Overlay:
  drawing of 9 lines, arcs and shapes, not listed
  text "Rev-v2.0" at -96.59,2171.06 h60 r270
  text "24V-7AMP-POWER-BOARD" at 9.88,1804.6 h60 r270
  text "CAUTION" at 3324.58,860.72 h120
  text "HIGH VOLTAGE" at 3427.68,768.93 h120
Board Outline:
  lines w5: -253.57,-31.71 ccw(c-29.16,-31.71) -29.16,-256.12 4443.28,-256.12 ccw(c4443.28,-31.71) 4667.69,-31.71 4667.69,5621.84 ccw(c4443.28,5621.84) 4443.28,5846.25 -29.16,5846.25 ccw(c-29.16,5621.84) -253.57,5621.84 -253.57,-31.71 ; 2983.24,3701.32 4152.93,3701.32 4152.93,3886.76 2983.24,3886.76 2983.24,3701.32
  lines w10: 2183.01,4010 ccw(c2213.01,4010) 2213.01,3980 2667.08,3980 ccw(c2667.08,4010) 2697.08,4010 2697.08,4018.19 ccw(c2667.08,4018.19) 2667.08,4048.19 2213.01,4048.19 ccw(c2213.01,4018.19) 2183.01,4018.19 2183.01,4010
Fabrication:
  drawing of 191 lines, arcs and shapes, not listed
  text "Layer" at 6405.58,5780 h60
  text "Name" at 6815.49,5780 h60
  text "Material" at 7745.23,5780 h60
  text "Thickness" at 8605,5780 h60
  text "Constant" at 9254.84,5780 h60
  text "Board Layer Stack" at 9824.7,5780 h60
  text "Top Overlay" at 6815.49,5660 h60
  text "Top Solder" at 6815.49,5540 h60
  text "Solder Resist" at 7745.23,5540 h60
  text "0.010mm" at 8605,5540 h60
  text "3.5" at 9254.84,5540 h60
  text "1" at 6405.58,5420 h60
  text "Top Layer" at 6815.49,5420 h60
  text "0.036mm" at 8605,5420 h60
  text "Dielectric 1" at 6815.49,5300 h60
  text "FR-4" at 7745.23,5300 h60
  text "0.320mm" at 8605,5300 h60
  text "4.8" at 9254.84,5300 h60
  text "2" at 6405.58,5180 h60
  text "Bottom Layer" at 6815.49,5180 h60
  text "0.036mm" at 8605,5180 h60
  text "Bottom Solder" at 6815.49,5060 h60
  text "Solder Resist" at 7745.23,5060 h60
  text "0.010mm" at 8605,5060 h60
  text "3.5" at 9254.84,5060 h60
  text "Bottom Overlay" at 6815.49,4940 h60
  text "Total board thickness:" at 6405.58,4820 h60
  text "0.411mm" at 8605,4820 h60
Drill Drawing:
  drawing of 186 lines, arcs and shapes, not listed
  text "Symbol" at -1389.61,10485 h72
  text "Count" at -883.74,10485 h72
  text "Hole Size" at -293.89,10485 h72
  text "Plated" at 855.77,10485 h72
  text "Hole Type" at 1361.65,10485 h72
  text "Drill Layer Pair" at 2095.45,10485 h72
  text "Via/Pad" at 3595,10485 h72
  text "Pad Shape" at 4184.85,10485 h72
  text "Template" at 4930.65,10485 h72
  text "81" at -883.74,10335 h60
  text "0.500mm (19.69mil)" at -293.89,10335 h60
  text "PTH" at 855.77,10335 h60
  text "Round" at 1361.65,10335 h60
  text "Top Layer - Bottom Layer" at 2095.45,10335 h60
  text "Via" at 3595,10335 h60
  text "Rounded" at 4184.85,10335 h60
  text "v100h50m0mx0" at 4930.65,10335 h60
  text "F" at -1418.7,10325.01 h66.67
  text "4" at -883.74,10185 h60
  text "0.700mm (27.56mil)" at -293.89,10185 h60
  text "PTH" at 855.77,10185 h60
  text "Slot" at 1361.65,10185 h60
  text "Top Layer - Bottom Layer" at 2095.45,10185 h60
  text "Pad" at 3595,10185 h60
  text "Rounded" at 4184.85,10185 h60
  text "r300_140h70_220r70m310_150mx310_150p0" at 4930.65,10185 h60
  text "12" at -883.74,10035 h60
  text "0.800mm (31.50mil)" at -293.89,10035 h60
  text "PTH" at 855.77,10035 h60
  text "Round" at 1361.65,10035 h60
  text "Top Layer - Bottom Layer" at 2095.45,10035 h60
  text "Pad" at 3595,10035 h60
  text "(Mixed)" at 4184.85,10035 h60
  text "(Mixed)" at 4930.65,10035 h60
  text "2" at -883.74,9885 h60
  text "0.820mm (32.28mil)" at -293.89,9885 h60
  text "PTH" at 855.77,9885 h60
  text "Round" at 1361.65,9885 h60
  text "Top Layer - Bottom Layer" at 2095.45,9885 h60
  text "Pad" at 3595,9885 h60
  text "Rounded" at 4184.85,9885 h60
  text "c160h82" at 4930.65,9885 h60
  text "10" at -883.74,9735 h60
  text "0.850mm (33.47mil)" at -293.89,9735 h60
  text "PTH" at 855.77,9735 h60
  text "Round" at 1361.65,9735 h60
  text "Top Layer - Bottom Layer" at 2095.45,9735 h60
  text "Pad" at 3595,9735 h60
  text "(Mixed)" at 4184.85,9735 h60
  text "(Mixed)" at 4930.65,9735 h60
  text "6" at -883.74,9585 h60
  text "0.914mm (36.00mil)" at -293.89,9585 h60
  text "PTH" at 855.77,9585 h60
  text "Round" at 1361.65,9585 h60
  text "Top Layer - Bottom Layer" at 2095.45,9585 h60
  text "Pad" at 3595,9585 h60
  text "(Mixed)" at 4184.85,9585 h60
  text "(Mixed)" at 4930.65,9585 h60
  text "4" at -883.74,9435 h60
  text "0.920mm (36.22mil)" at -293.89,9435 h60
  text "PTH" at 855.77,9435 h60
  text "Round" at 1361.65,9435 h60
  text "Top Layer - Bottom Layer" at 2095.45,9435 h60
  text "Pad" at 3595,9435 h60
  text "(Mixed)" at 4184.85,9435 h60
  text "(Mixed)" at 4930.65,9435 h60
  text "8" at -883.74,9285 h60
  text "1.000mm (39.37mil)" at -293.89,9285 h60
  text "PTH" at 855.77,9285 h60
  text "Round" at 1361.65,9285 h60
  text "Top Layer - Bottom Layer" at 2095.45,9285 h60
  text "Pad" at 3595,9285 h60
  text "(Mixed)" at 4184.85,9285 h60
  text "(Mixed)" at 4930.65,9285 h60
  text "2" at -883.74,9135 h60
  text "1.092mm (43.00mil)" at -293.89,9135 h60
  text "PTH" at 855.77,9135 h60
  text "Round" at 1361.65,9135 h60
  text "Top Layer - Bottom Layer" at 2095.45,9135 h60
  text "Pad" at 3595,9135 h60
  text "Rounded" at 4184.85,9135 h60
  text "c180h109m180p0" at 4930.65,9135 h60
  text "4" at -883.74,8985 h60
  text "1.100mm (43.31mil)" at -293.89,8985 h60
  text "PTH" at 855.77,8985 h60
  text "Round" at 1361.65,8985 h60
  text "Top Layer - Bottom Layer" at 2095.45,8985 h60
  text "Pad" at 3595,8985 h60
  text "Rounded" at 4184.85,8985 h60
  text "c220h110" at 4930.65,8985 h60
  text "2" at -883.74,8835 h60
  text "1.100mm (43.31mil)" at -293.89,8835 h60
  text "PTH" at 855.77,8835 h60
  text "Round" at 1361.65,8835 h60
  text "Top Layer - Bottom Layer" at 2095.45,8835 h60
  text "Pad" at 3595,8835 h60
  text "Rounded" at 4184.85,8835 h60
  text "(Mixed)" at 4930.65,8835 h60
  text "2" at -883.74,8685 h60
  text "1.200mm (47.24mil)" at -293.89,8685 h60
  text "PTH" at 855.77,8685 h60
  text "Round" at 1361.65,8685 h60
  text "Top Layer - Bottom Layer" at 2095.45,8685 h60
  text "Pad" at 3595,8685 h60
  text "Rounded" at 4184.85,8685 h60
  text "(Mixed)" at 4930.65,8685 h60
  text "23" at -883.74,8535 h60
  text "1.200mm (47.24mil)" at -293.89,8535 h60
  text "PTH" at 855.77,8535 h60
  text "Round" at 1361.65,8535 h60
  text "Top Layer - Bottom Layer" at 2095.45,8535 h60
  text "Pad" at 3595,8535 h60
  text "(Mixed)" at 4184.85,8535 h60
  text "(Mixed)" at 4930.65,8535 h60
  text "4" at -883.74,8385 h60
  text "1.300mm (51.18mil)" at -293.89,8385 h60
  text "PTH" at 855.77,8385 h60
  text "Round" at 1361.65,8385 h60
  text "Top Layer - Bottom Layer" at 2095.45,8385 h60
  text "Pad" at 3595,8385 h60
  text "Rounded" at 4184.85,8385 h60
  text "c250h130" at 4930.65,8385 h60
  text "2" at -883.74,8235 h60
  text "1.400mm (55.12mil)" at -293.89,8235 h60
  text "PTH" at 855.77,8235 h60
  text "Round" at 1361.65,8235 h60
  text "Top Layer - Bottom Layer" at 2095.45,8235 h60
  text "Pad" at 3595,8235 h60
  text "(Mixed)" at 4184.85,8235 h60
  text "(Mixed)" at 4930.65,8235 h60
  text "B" at -1418.7,8225.01 h66.67
  text "2" at -883.74,8085 h60
  text "1.500mm (59.06mil)" at -293.89,8085 h60
  text "PTH" at 855.77,8085 h60
  text "Rectangle" at 1361.65,8085 h60
  text "Top Layer - Bottom Layer" at 2095.45,8085 h60
  text "Pad" at 3595,8085 h60
  text "Rectangle" at 4184.85,8085 h60
  text "r700_300h150_550" at 4930.65,8085 h60
  text "18" at -883.74,7935 h60
  text "1.600mm (62.99mil)" at -293.89,7935 h60
  text "PTH" at 855.77,7935 h60
  text "Round" at 1361.65,7935 h60
  text "Top Layer - Bottom Layer" at 2095.45,7935 h60
  text "Pad" at 3595,7935 h60
  text "(Mixed)" at 4184.85,7935 h60
  text "(Mixed)" at 4930.65,7935 h60
  text "D" at -1418.7,7925.01 h66.67
  text "2" at -883.74,7785 h60
  text "2.300mm (90.55mil)" at -293.89,7785 h60
  text "PTH" at 855.77,7785 h60
  text "Round" at 1361.65,7785 h60
  text "Top Layer - Bottom Layer" at 2095.45,7785 h60
  text "Pad" at 3595,7785 h60
  text "Rounded" at 4184.85,7785 h60
  text "c380h230m390mx390p0" at 4930.65,7785 h60
  text "A" at -1418.7,7775.01 h66.67
  text "4" at -883.74,7635 h60
  text "2.400mm (94.49mil)" at -293.89,7635 h60
  text "PTH" at 855.77,7635 h60
  text "Round" at 1361.65,7635 h60
  text "Top Layer - Bottom Layer" at 2095.45,7635 h60
  text "Pad" at 3595,7635 h60
  text "Rounded" at 4184.85,7635 h60
  text "c380h240m390mx390p0" at 4930.65,7635 h60
  text "C" at -1418.7,7625.01 h66.67
  text "1" at -883.74,7485 h60
  text "4.400mm (173.23mil)" at -293.89,7485 h60
  text "NPTH" at 855.77,7485 h60
  text "Round" at 1361.65,7485 h60
  text "Top Layer - Bottom Layer" at 2095.45,7485 h60
  text "Pad" at 3595,7485 h60
  text "Rounded" at 4184.85,7485 h60
  text "c0hn440" at 4930.65,7485 h60
  text "4" at -883.74,7335 h60
  text "5.000mm (196.85mil)" at -293.89,7335 h60
  text "PTH" at 855.77,7335 h60
  text "Round" at 1361.65,7335 h60
  text "Top Layer - Bottom Layer" at 2095.45,7335 h60
  text "Pad" at 3595,7335 h60
  text "Rounded" at 4184.85,7335 h60
  text "c1000h500" at 4930.65,7335 h60
  text "E" at -1418.7,7325.01 h66.67
  text "197 Total" at -883.74,7185 h60
  text "Slot definitions :" at -1389.61,7040.03 h60
  text "Routed Path Length" at -356.92,7040.03 h60
  text "= Calculated from tool start centre position to tool end centre position." at 745.74,7040.03 h60
  text "Hole Length" at -356.92,6940.05 h60
  text "= Routed Path Length + Tool Size = Slot length as defined in the PCB layout" at 335.88,6940.05 h60

## Dimensions
4443.28,5846.25 to 4443.28,-256.12 on Dimensions
-253.57,5621.84 to 4667.69,5621.84 on Dimensions